# EAGLE board UsbChargeAndStepUpConnector2 (EAGLE 8.0.1)
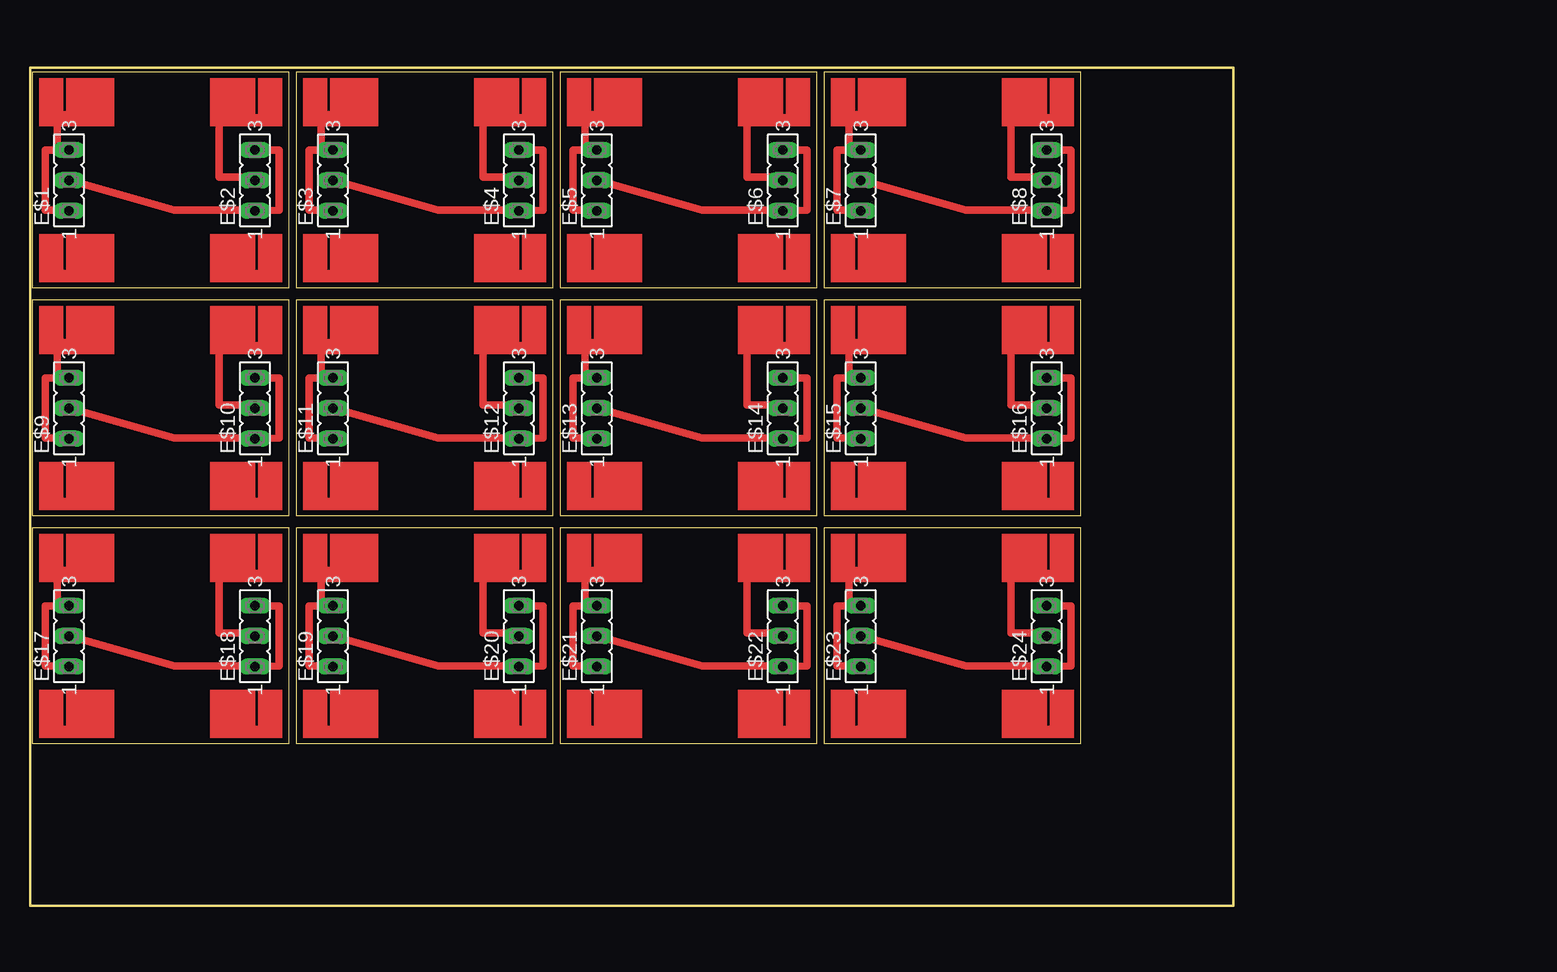
[diagram p0: board, top side]
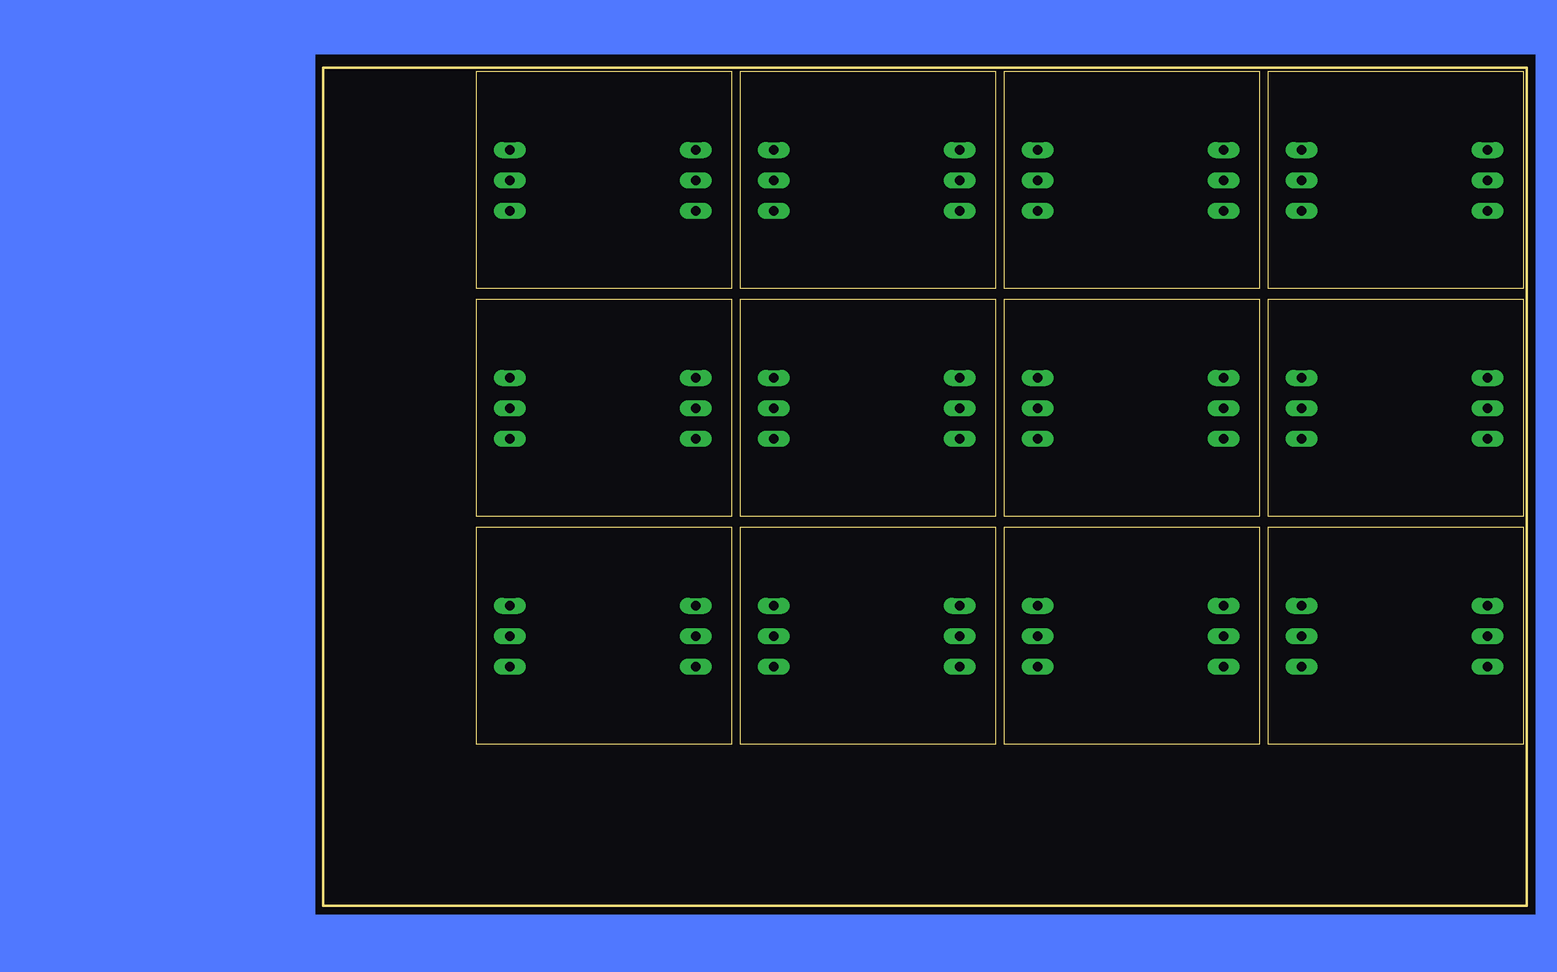
[diagram p1: board, bottom side, seen from below]

Size 100.33 x 69.85 mm. Coordinates in mm from the lower left corner, seen from the top.
Outline: 0,0 0,69.85 100.33,69.85 100.33,0 0,0
Outline: 0.22,69.51 21.58,69.51 21.58,51.48 0.22,51.48 0.22,69.51
Outline: 22.22,69.51 43.58,69.51 43.58,51.48 22.22,51.48 22.22,69.51
Outline: 44.22,69.51 65.58,69.51 65.58,51.48 44.22,51.48 44.22,69.51
Outline: 66.22,69.51 87.58,69.51 87.58,51.48 66.22,51.48 66.22,69.51
Outline: 0.22,50.51 21.58,50.51 21.58,32.48 0.22,32.48 0.22,50.51
Outline: 22.22,50.51 43.58,50.51 43.58,32.48 22.22,32.48 22.22,50.51
Outline: 44.22,50.51 65.58,50.51 65.58,32.48 44.22,32.48 44.22,50.51
Outline: 66.22,50.51 87.58,50.51 87.58,32.48 66.22,32.48 66.22,50.51
Outline: 0.22,31.51 21.58,31.51 21.58,13.48 0.22,13.48 0.22,31.51
Outline: 22.22,31.51 43.58,31.51 43.58,13.48 22.22,13.48 22.22,31.51
Outline: 44.22,31.51 65.58,31.51 65.58,13.48 44.22,13.48 44.22,31.51
Outline: 66.22,31.51 87.58,31.51 87.58,13.48 66.22,13.48 66.22,31.51
Copper layers (1*16): Top 0.035mm / dielectric 1.5mm / Bottom 0.035mm
Design rules "default": minimum track width 10mil, minimum drill 24mil, track to track 8mil, track to pad 8mil, pad to pad 8mil, via to via 8mil, smd to smd 8mil, copper to edge 40mil, drill to drill 8mil, minimum pad ring 10mil, minimum via ring 8mil, stop-mask expansion 4mil, vias tented up to drill 0mil, thermal gap 10mil

## Footprints (pad centres in the part's own frame; a part is rotated, then mirrored left to right if it is on the bottom)
FE03-1 = drill 0.813 long: 1 -5.08,0; 2 -2.54,0; 5 0,0

## Placement (x,y rotation side)
E$1  [FE03-1]  3.25,63 90 top
E$2  [FE03-1]  18.75,63 90 top
E$3  [FE03-1]  25.25,63 90 top
E$4  [FE03-1]  40.75,63 90 top
E$5  [FE03-1]  47.25,63 90 top
E$6  [FE03-1]  62.75,63 90 top
E$7  [FE03-1]  69.25,63 90 top
E$8  [FE03-1]  84.75,63 90 top
E$9  [FE03-1]  3.25,44 90 top
E$10  [FE03-1]  18.75,44 90 top
E$11  [FE03-1]  25.25,44 90 top
E$12  [FE03-1]  40.75,44 90 top
E$13  [FE03-1]  47.25,44 90 top
E$14  [FE03-1]  62.75,44 90 top
E$15  [FE03-1]  69.25,44 90 top
E$16  [FE03-1]  84.75,44 90 top
E$17  [FE03-1]  3.25,25 90 top
E$18  [FE03-1]  18.75,25 90 top
E$19  [FE03-1]  25.25,25 90 top
E$20  [FE03-1]  40.75,25 90 top
E$21  [FE03-1]  47.25,25 90 top
E$22  [FE03-1]  62.75,25 90 top
E$23  [FE03-1]  69.25,25 90 top
E$24  [FE03-1]  84.75,25 90 top

## Library data of the parts
E$1-E$24 = con-lsta

## Nets
S$2: E$1.1 E$1.5
S$3: E$1.2 E$2.1 E$2.5
S$4: E$2.2
S$8: E$3.1 E$3.5
S$9: E$3.2 E$4.1 E$4.5
S$10: E$4.2
S$12: E$5.1 E$5.5
S$13: E$5.2 E$6.1 E$6.5
S$14: E$6.2
S$16: E$7.1 E$7.5
S$17: E$7.2 E$8.1 E$8.5
S$18: E$8.2
S$20: E$9.1 E$9.5
S$21: E$9.2 E$10.1 E$10.5
S$22: E$10.2
S$24: E$11.1 E$11.5
S$25: E$11.2 E$12.1 E$12.5
S$26: E$12.2
S$28: E$13.1 E$13.5
S$29: E$13.2 E$14.1 E$14.5
S$30: E$14.2
S$32: E$15.1 E$15.5
S$33: E$15.2 E$16.1 E$16.5
S$34: E$16.2
S$36: E$17.1 E$17.5
S$37: E$17.2 E$18.1 E$18.5
S$38: E$18.2
S$40: E$19.1 E$19.5
S$41: E$19.2 E$20.1 E$20.5
S$42: E$20.2
S$44: E$21.1 E$21.5
S$45: E$21.2 E$22.1 E$22.5
S$46: E$22.2
S$48: E$23.1 E$23.5
S$49: E$23.2 E$24.1 E$24.5
S$50: E$24.2

## Tracks (layer width: path | path; a pad name or v marks a point on that pad's centre or on a via)
S$2
  Top 0.61: E$1.1 3.25,58 1.25,58 1.25,63 E$1.5 2.25,63 2.25,67.75
S$3
  Top 0.61: E$2.5 20.75,63 20.75,58 E$2.1 18.75,58 12,58 3.25,60.5 E$1.2
S$4
  Top 0.61: E$2.2 18.25,60.46 18.25,60.75 15.75,60.75 15.75,67.75 18.02,67.75 18.02,67.79
S$5
  Top 0.61: 4.05,67.75 4.05,67.79
S$7
  Top 0.61: 26.05,67.75 26.05,67.79
S$8
  Top 0.61: E$3.1 25.25,58 23.25,58 23.25,63 E$3.5 24.25,63 24.25,67.75
S$9
  Top 0.61: E$4.5 42.75,63 42.75,58 E$4.1 40.75,58 34,58 25.25,60.5 E$3.2
S$10
  Top 0.61: E$4.2 40.25,60.46 40.25,60.75 37.75,60.75 37.75,67.75 40.02,67.75 40.02,67.79
S$11
  Top 0.61: 48.05,67.75 48.05,67.79
S$12
  Top 0.61: E$5.1 47.25,58 45.25,58 45.25,63 E$5.5 46.25,63 46.25,67.75
S$13
  Top 0.61: E$6.5 64.75,63 64.75,58 E$6.1 62.75,58 56,58 47.25,60.5 E$5.2
S$14
  Top 0.61: E$6.2 62.25,60.46 62.25,60.75 59.75,60.75 59.75,67.75 62.02,67.75 62.02,67.79
S$15
  Top 0.61: 70.05,67.75 70.05,67.79
S$16
  Top 0.61: E$7.1 69.25,58 67.25,58 67.25,63 E$7.5 68.25,63 68.25,67.75
S$17
  Top 0.61: E$8.5 86.75,63 86.75,58 E$8.1 84.75,58 78,58 69.25,60.5 E$7.2
S$18
  Top 0.61: E$8.2 84.25,60.46 84.25,60.75 81.75,60.75 81.75,67.75 84.02,67.75 84.02,67.79
S$19
  Top 0.61: 4.05,48.75 4.05,48.79
S$20
  Top 0.61: E$9.1 3.25,39 1.25,39 1.25,44 E$9.5 2.25,44 2.25,48.75
S$21
  Top 0.61: E$10.5 20.75,44 20.75,39 E$10.1 18.75,39 12,39 3.25,41.5 E$9.2
S$22
  Top 0.61: E$10.2 18.25,41.46 18.25,41.75 15.75,41.75 15.75,48.75 18.02,48.75 18.02,48.79
S$23
  Top 0.61: 26.05,48.75 26.05,48.79
S$24
  Top 0.61: E$11.1 25.25,39 23.25,39 23.25,44 E$11.5 24.25,44 24.25,48.75
S$25
  Top 0.61: E$12.5 42.75,44 42.75,39 E$12.1 40.75,39 34,39 25.25,41.5 E$11.2
S$26
  Top 0.61: E$12.2 40.25,41.46 40.25,41.75 37.75,41.75 37.75,48.75 40.02,48.75 40.02,48.79
S$27
  Top 0.61: 48.05,48.75 48.05,48.79
S$28
  Top 0.61: E$13.1 47.25,39 45.25,39 45.25,44 E$13.5 46.25,44 46.25,48.75
S$29
  Top 0.61: E$14.5 64.75,44 64.75,39 E$14.1 62.75,39 56,39 47.25,41.5 E$13.2
S$30
  Top 0.61: E$14.2 62.25,41.46 62.25,41.75 59.75,41.75 59.75,48.75 62.02,48.75 62.02,48.79
S$31
  Top 0.61: 70.05,48.75 70.05,48.79
S$32
  Top 0.61: E$15.1 69.25,39 67.25,39 67.25,44 E$15.5 68.25,44 68.25,48.75
S$33
  Top 0.61: E$16.5 86.75,44 86.75,39 E$16.1 84.75,39 78,39 69.25,41.5 E$15.2
S$34
  Top 0.61: E$16.2 84.25,41.46 84.25,41.75 81.75,41.75 81.75,48.75 84.02,48.75 84.02,48.79
S$35
  Top 0.61: 4.05,29.75 4.05,29.79
S$36
  Top 0.61: E$17.1 3.25,20 1.25,20 1.25,25 E$17.5 2.25,25 2.25,29.75
S$37
  Top 0.61: E$18.5 20.75,25 20.75,20 E$18.1 18.75,20 12,20 3.25,22.5 E$17.2
S$38
  Top 0.61: E$18.2 18.25,22.46 18.25,22.75 15.75,22.75 15.75,29.75 18.02,29.75 18.02,29.79
S$39
  Top 0.61: 26.05,29.75 26.05,29.79
S$40
  Top 0.61: E$19.1 25.25,20 23.25,20 23.25,25 E$19.5 24.25,25 24.25,29.75
S$41
  Top 0.61: E$20.5 42.75,25 42.75,20 E$20.1 40.75,20 34,20 25.25,22.5 E$19.2
S$42
  Top 0.61: E$20.2 40.25,22.46 40.25,22.75 37.75,22.75 37.75,29.75 40.02,29.75 40.02,29.79
S$43
  Top 0.61: 48.05,29.75 48.05,29.79
S$44
  Top 0.61: E$21.1 47.25,20 45.25,20 45.25,25 E$21.5 46.25,25 46.25,29.75
S$45
  Top 0.61: E$22.5 64.75,25 64.75,20 E$22.1 62.75,20 56,20 47.25,22.5 E$21.2
S$46
  Top 0.61: E$22.2 62.25,22.46 62.25,22.75 59.75,22.75 59.75,29.75 62.02,29.75 62.02,29.79
S$47
  Top 0.61: 70.05,29.75 70.05,29.79
S$48
  Top 0.61: E$23.1 69.25,20 67.25,20 67.25,25 E$23.5 68.25,25 68.25,29.75
S$49
  Top 0.61: E$24.5 86.75,25 86.75,20 E$24.1 84.75,20 78,20 69.25,22.5 E$23.2
S$50
  Top 0.61: E$24.2 84.25,22.46 84.25,22.75 81.75,22.75 81.75,29.75 84.02,29.75 84.02,29.79
(copper drawn outside any net)
  shapes: Bottom area x6, Top area x192

## Text on the board
tTest: in + | in-/B- | in + | in-/B- | in + | in-/B- | in + | in-/B- | sw1 | cb+ | sw1 | cb+ | sw1 | cb+ | sw1 | cb+ | sw2 | cb- | sw2 | cb- | sw2 | cb- | sw2 | cb- | b l | b+ | b l | b+ | b l | b+ | b l | b+ | Step up | Step up | Step up | Step up | out + | out - | out + | out - | out + | out - | out + | out - | in + | in-/B- | in + | in-/B- | in + | in-/B- | in + | in-/B- | sw1 | cb+ | sw1 | cb+ | sw1 | cb+ | sw1 | cb+ | sw2 | cb- | sw2 | cb- | sw2 | cb- | sw2 | cb- | b l | b+ | b l | b+ | b l | b+ | b l | b+ | Step up | Step up | Step up | Step up | out + | out - | out + | out - | out + | out - | out + | out - | in + | in-/B- | in + | in-/B- | in + | in-/B- | in + | in-/B- | sw1 | cb+ | sw1 | cb+ | sw1 | cb+ | sw1 | cb+ | sw2 | cb- | sw2 | cb- | sw2 | cb- | sw2 | cb- | b l | b+ | b l | b+ | b l | b+ | b l | b+ | Step up | Step up | Step up | Step up | out + | out - | out + | out - | out + | out - | out + | out -